# Altium PCB Thunderscope_Rev5.3.PcbDoc (part 3 of 14)
Units mil, origin at the board's own origin, x right, y up, seen from the top; angles counter-clockwise.
Board outline 3937.01 x 3838.58 mil, 6 copper layers (F.Cu, In1.Cu (GND), In2.Cu (Sign), In3.Cu (Sign), In4.Cu (GND), B.Cu), stack 60.556 mil thick; 911 components, 486 nets, 2834 pads, 2761 vias.
Unrouted connection lines stored in the file: 618.
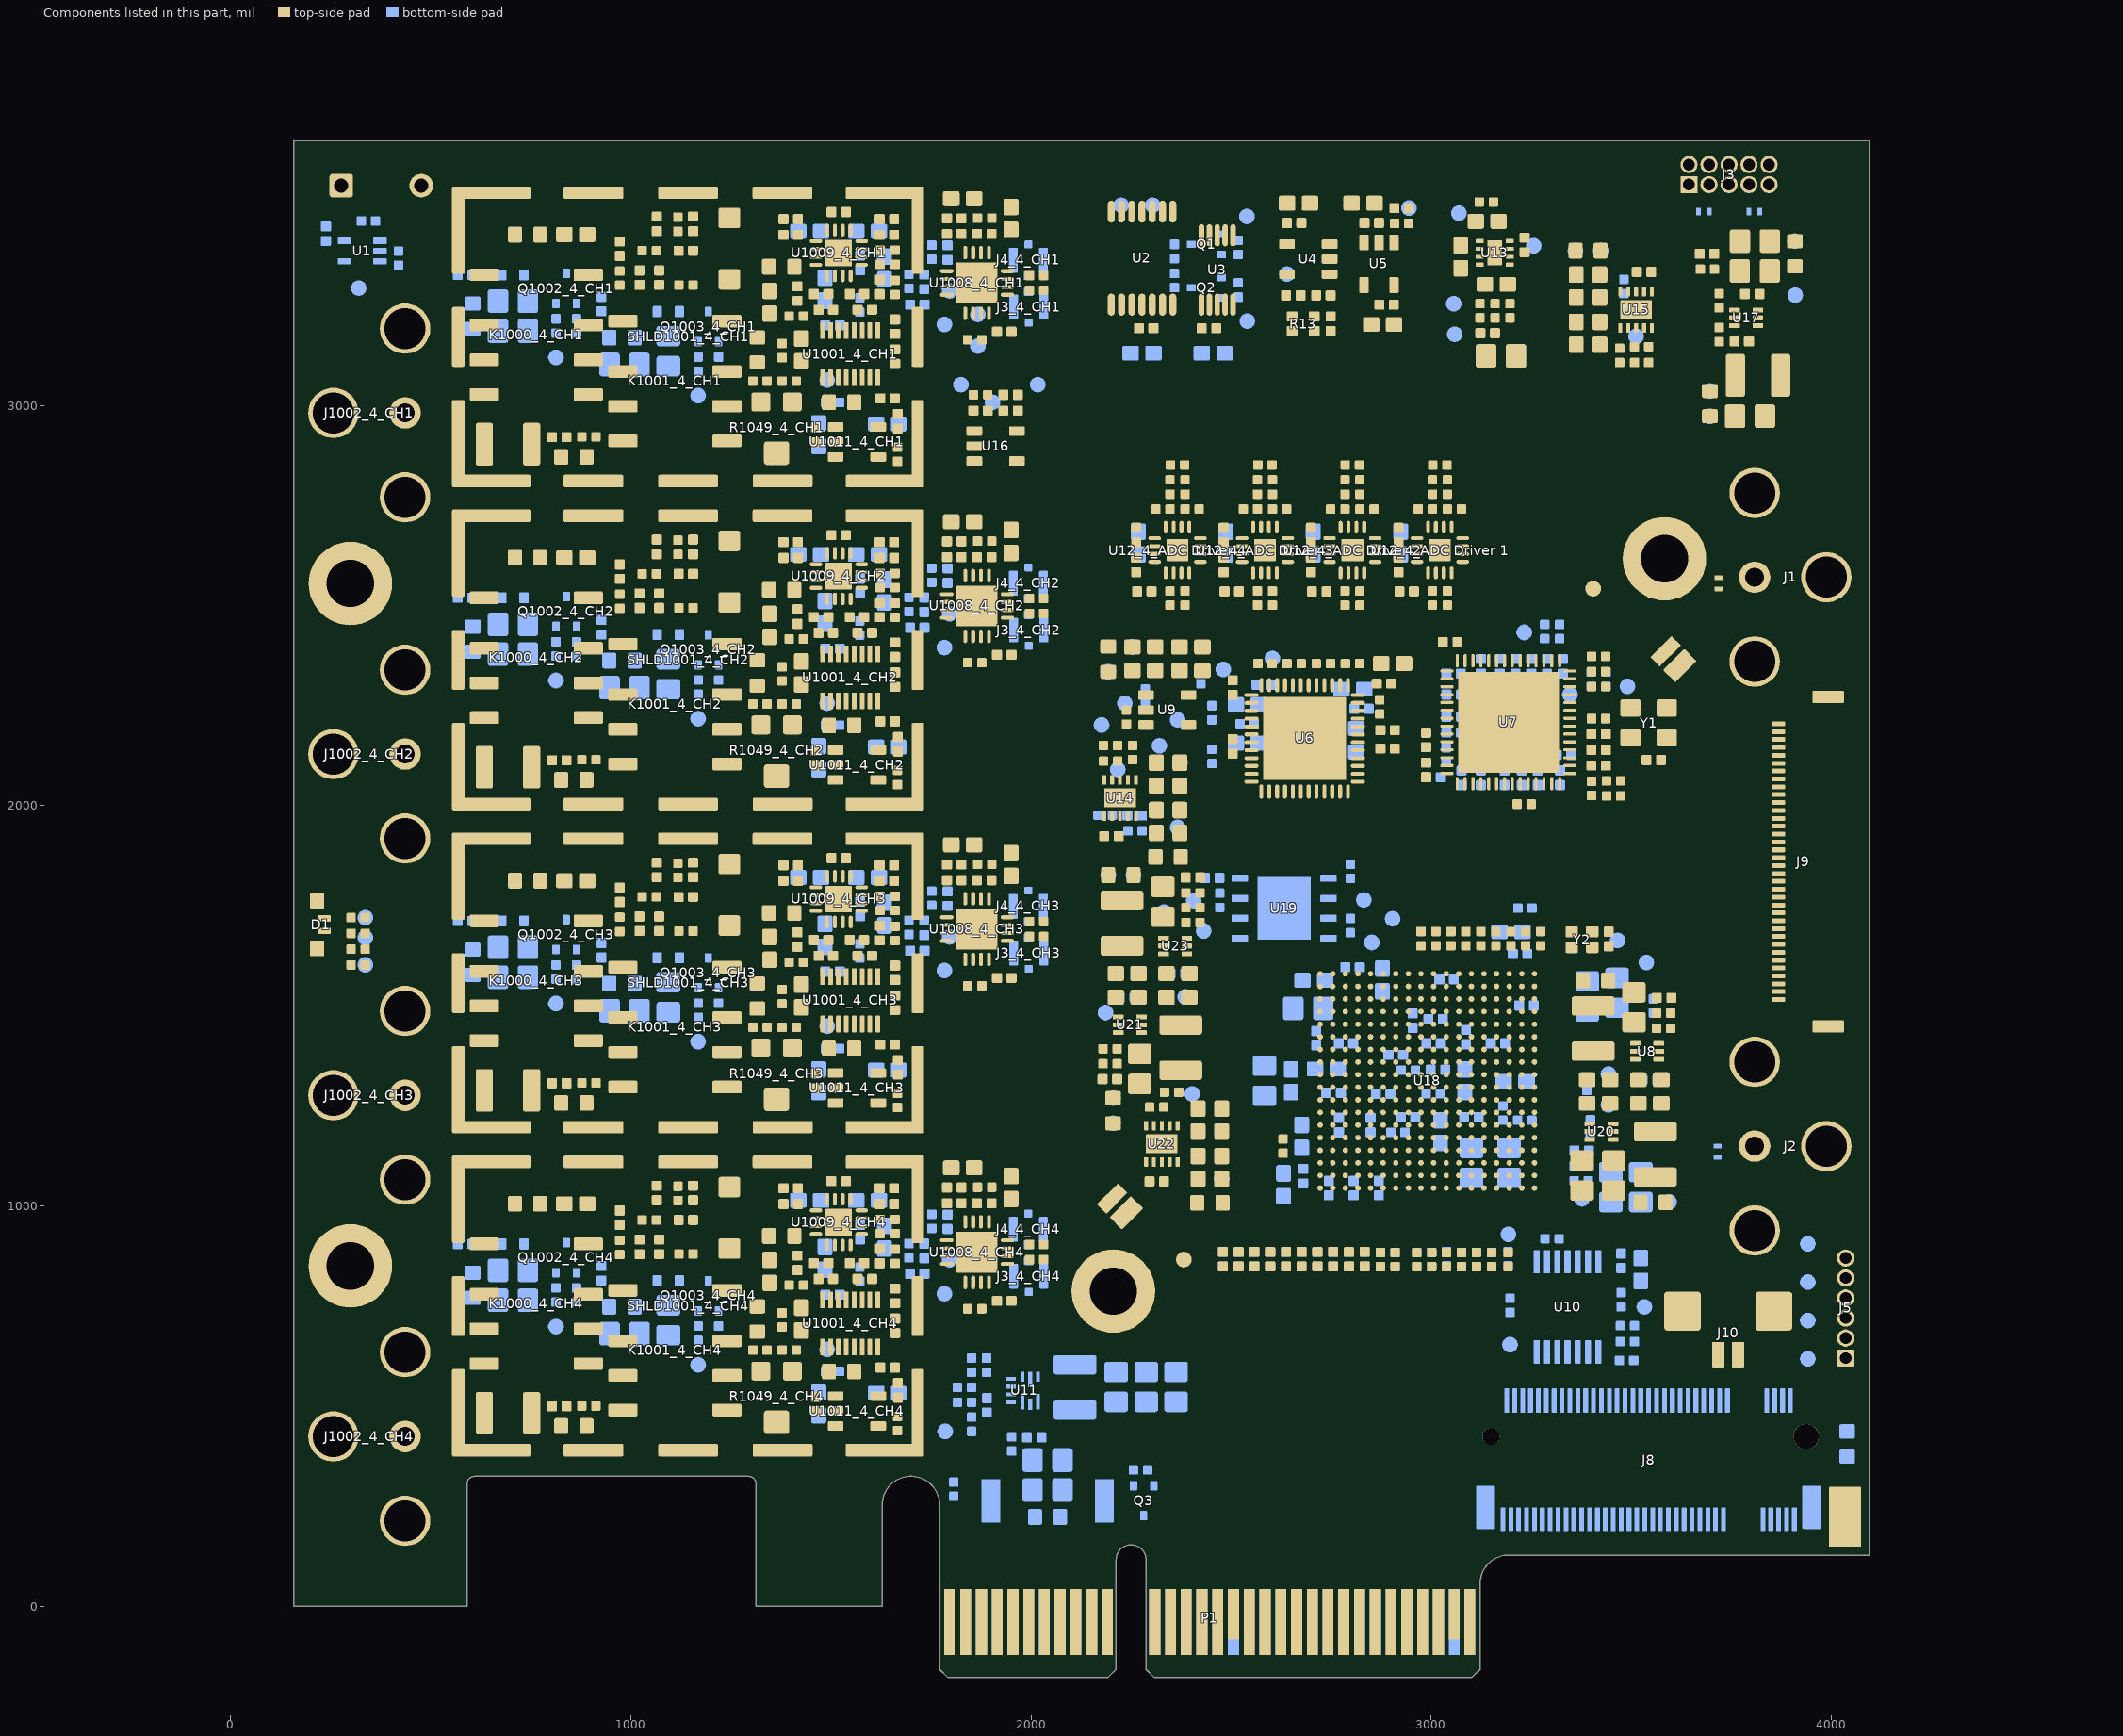
[diagram p7: the components of this part, seen from the top]

## Components (designator, comment, footprint, x,y, rotation, side; value= is the part's Value field where it differs from the comment) (continued)
R18 "DNP" GEN_R_0402 2584.65,2355.32 r180 top
R19 "DNP" GEN_R_0402 2657.21,2355.32 r180 top
R20 "DNP" GEN_R_0402 2730.31,2355.32 r180 top
R21 "DNP" GEN_R_0402 2803.15,2355.32 r180 top
R22 "100" GEN_R_0402 2871.35,2247.05 r270 top
R23 "49.9" GEN_R_0402 3191.93,866.14 r90 top
R24 "49.9" GEN_R_0402 3191.93,868.11 r90 bottom
R25 "0" GEN_R_0402 3150.59,866.14 r90 top
R26 "0" GEN_R_0402 3112.84,866.14 r90 top
R27 "0" GEN_R_0402 3150.59,866.14 r90 bottom
R28 "0" GEN_R_0402 3112.84,866.14 r90 bottom
R29 "0" GEN_R_0402 3075.44,866.14 r90 top
R30 "0" GEN_R_0402 3038.04,866.14 r90 top
R31 "0" GEN_R_0402 3075.44,866.14 r90 bottom
R32 "0" GEN_R_0402 3038.04,868.11 r90 bottom
R33 "0" GEN_R_0402 3000.98,866.14 r90 top
R34 "0" GEN_R_0402 2963.58,866.14 r90 top
R35 "0" GEN_R_0402 3000.98,866.14 r90 bottom
R36 "0" GEN_R_0402 2963.58,866.14 r90 bottom
R37 "0" GEN_R_0402 2910.08,866.14 r90 top
R38 "0" GEN_R_0402 2873.03,866.14 r90 top
R39 "0" GEN_R_0402 2909.78,866.14 r90 bottom
R40 "0" GEN_R_0402 2873.03,866.14 r90 bottom
R41 "0" GEN_R_0402 1807.09,292.32 r270 bottom
R42 "0.01" GEN_R_0603 2041.34,223.43 r0 bottom
R43 "49.9" GEN_R_0402 3232.28,2003.94 r180 top
R44 "1K" GEN_R_0402 3320.87,2435.04 r90 bottom
R45 "10K" GEN_R_0402 3283.46,2435.04 r270 bottom
R46 "4.7K" GEN_R_0402 3399.61,2315.94 r270 bottom
R47 "4.7K" GEN_R_0402 3437.01,2315.94 r270 bottom
R48 "1K" GEN_R_0402 3418.31,2297.24 r0 top
R49 "1K" GEN_R_0402 3418.31,2335.63 r0 top
R50 "1K" GEN_R_0402 3418.31,2217.52 r0 bottom
R51 "1K" GEN_R_0402 3418.31,2217.52 r0 top
R52 "1K" GEN_R_0402 3418.31,2373.03 r0 top
R52_4_CH1 "0" GEN_R_0402 2013.78,3324.8 r180 top (schematic designator R52_4)
R52_4_CH2 "0" GEN_R_0402 2013.78,2517.72 r180 top (schematic designator R52_4)
R52_4_CH3 "0" GEN_R_0402 2013.78,1710.63 r180 top (schematic designator R52_4)
R52_4_CH4 "0" GEN_R_0402 2013.78,903.54 r180 top (schematic designator R52_4)
R53 "1K" GEN_R_0402 3418.31,2179.13 r0 bottom
R54 "0.01" GEN_R_0603 4039.37,405.51 r270 bottom
R55 "90.9k" GEN_R_0402 3580.71,1481.74 r180 top
R56 "20k" GEN_R_0402 3580.71,1444.34 r180 top
R57 "0.01" GEN_R_0603 3410.43,1563.44 r0 top
R58 "10K" GEN_R_0402 3555.12,1500 r90 bottom
R59 "10K" GEN_R_0402 3234.25,1744.09 r180 bottom
R60 "100" GEN_R_0402 3302.16,918.31 r180 bottom
R61 "10K" GEN_R_0402 3196.85,751.97 r270 bottom
R62 "10K" GEN_R_0402 3474.41,765.75 r270 bottom
R63 "49.9" GEN_R_0402 3488.19,614.17 r180 bottom
R64 "2K" GEN_R_0402 318.9,1602.36 r0 top
R65 "1K" GEN_R_0402 318.9,1681.1 r180 top
R66 "10K" GEN_R_0402 2797.64,1700.39 r270 bottom
R67 "10K" GEN_R_0402 2797.64,1836.22 r270 bottom
R68 "10K" GEN_R_0402 2471.46,1763.78 r90 bottom
R69 "4.7K" GEN_R_0402 3375,1062.99 r0 bottom
R70 "4.7K" GEN_R_0402 2404.53,1745.08 r180 top
R71 "0.01" GEN_R_0603 3908.86,3378.94 r270 top
R72 "10K" GEN_R_0402 3719.49,3177.17 r90 top
R73 "4.7K" GEN_R_0402 1833.66,509.84 r180 bottom
R74 "1K" GEN_R_0402 1851.38,602.36 r270 bottom
R75 "10K" GEN_R_0402 3273.62,1668.31 r90 top
R76 "10K" GEN_R_0402 3236.22,1668.31 r90 top
R77 "10K" GEN_R_0402 3161.42,1668.31 r90 top
R78 "10K" GEN_R_0402 3198.82,1668.31 r90 top
R79 "10K" GEN_R_0402 3124.02,1668.31 r90 top
R80 "10K" GEN_R_0402 3086.61,1668.31 r90 top
R81 "10K" GEN_R_0402 3049.21,1668.31 r90 top
R82 "10K" GEN_R_0402 3011.81,1668.31 r90 top
R85 "1K" GEN_R_0402 318.9,1641.73 r180 top
R86 "10K" GEN_R_0402 2259.84,1937.01 r180 bottom
R87 "10K" GEN_R_0402 1951.77,405.51 r90 bottom
R88 "35.7k" GEN_R_0402 1888.78,602.36 r270 bottom
R89 "0.01" GEN_R_0603 2192.91,2366.14 r270 top
R90 "0.1" GEN_R_0402 3137.8,3508.27 r0 top
R91 "120@100MHZ" GEN_R_0402 3122.05,3236.61 r90 top
R92 "10K" GEN_R_0402 1851.38,454.72 r90 bottom
R93 "280K" GEN_R_0402 3159.45,3236.61 r270 top
R94 "10K" GEN_R_0402 2238.19,2221.46 r270 top
R95 "1K" GEN_R_0402 1833.66,547.24 r180 bottom
R96 "90.9k" GEN_R_0402 3196.85,3236.61 r90 top
R97 "0.01" GEN_R_0603 2342.52,1872.05 r180 top
R97_4_CH1 "0" GEN_R_0402 2013.78,3287.4 r180 top (schematic designator R97_4)
R97_4_CH2 "0" GEN_R_0402 2013.78,2480.32 r180 top (schematic designator R97_4)
R97_4_CH3 "0" GEN_R_0402 2013.78,1673.23 r180 top (schematic designator R97_4)
R97_4_CH4 "0" GEN_R_0402 2013.78,866.14 r180 top (schematic designator R97_4)
R98 "0.01" GEN_R_0603 3391.93,3386.81 r0 top
R99 "4.7K" GEN_R_0402 2253.94,2132.87 r90 top
R100 "20k" GEN_R_0402 3470.67,3125 r270 top
R101 "10K" GEN_R_0402 2185.04,1976.38 r180 bottom
R102 "4.7K" GEN_R_0402 2198.82,2111.22 r180 top
R103 "20k" GEN_R_0402 2198.82,2150.59 r180 top
R104 "4.7K" GEN_R_0402 3525.79,3146.65 r0 top
R105 "20k" GEN_R_0402 3525.79,3107.28 r0 top
R106 "0.1" GEN_R_0402 1874.02,3026.57 r0 top
R107 "100" GEN_R_0402 2926.08,3454.92 r0 top
R108 "10K" GEN_R_0402 2273.62,340.55 r180 bottom
R109 "280K" GEN_R_0402 3689.76,3340.35 r180 top
R110 "35.7k" GEN_R_0402 3719.49,3261.81 r270 top
R111 "10K" GEN_R_0402 3481.3,3297.24 r90 bottom
R112 "100" GEN_R_0402 2974.41,1668.31 r270 top
R113 "4.7K" GEN_R_0402 3233.91,1214.04 r0 bottom
R114 "4.7K" GEN_R_0402 3178.8,1232.54 r90 bottom
R115 "100" GEN_R_0402 2629.92,1149.61 r270 top
R116 "0.01" GEN_R_0603 3554.13,1008.86 r180 top
R117 "10K" GEN_R_0402 3388.78,1270.67 r270 bottom
R118 "10K" GEN_R_0402 3375,1100.39 r0 bottom
R119 "4.7K" GEN_R_0402 3397.64,1197.83 r270 bottom
R120 "0.01" GEN_R_0603 2204.72,1238.19 r90 top
R121 "10K" GEN_R_0402 2240.16,1521.65 r180 bottom
R122 "20k" GEN_R_0402 2197.83,1355.31 r180 top
R123 "0.01" GEN_R_0603 2446.85,1007.87 r180 top
R124 "10K" GEN_R_0402 2197.83,1392.72 r0 top
R125 "1K" GEN_R_0402 2351.38,1284.45 r0 top
R126 "0.01" GEN_R_0603 2224.41,1826.77 r0 top
R127 "2K" GEN_R_0402 2314.17,1247.05 r0 top
R128 "10K" GEN_R_0402 2367.13,1580.71 r0 bottom
R129 "10K" GEN_R_0402 2404.53,1782.48 r0 top
R130 "10K" GEN_R_0402 2404.53,1707.68 r0 top
"R131_4_ADC Driver 1" "120" GEN_R_0402 3021.53,2851.38 r180 top (schematic designator R131_4)
"R131_4_ADC Driver 2" "120" GEN_R_0402 2803.02,2851.38 r180 top (schematic designator R131_4)
"R131_4_ADC Driver 3" "120" GEN_R_0402 2584.51,2851.38 r180 top (schematic designator R131_4)
"R131_4_ADC Driver 4" "120" GEN_R_0402 2366.01,2851.38 r180 top (schematic designator R131_4)
"R132_4_ADC Driver 1" "300" GEN_R_0402 3040.23,2796.26 r90 top (schematic designator R132_4)
"R132_4_ADC Driver 2" "300" GEN_R_0402 2821.72,2796.26 r90 top (schematic designator R132_4)
"R132_4_ADC Driver 3" "300" GEN_R_0402 2603.21,2796.26 r90 top (schematic designator R132_4)
"R132_4_ADC Driver 4" "300" GEN_R_0402 2384.71,2796.26 r90 top (schematic designator R132_4)
"R133_4_ADC Driver 1" "300" GEN_R_0402 3002.83,2796.26 r90 top (schematic designator R133_4)
"R133_4_ADC Driver 2" "300" GEN_R_0402 2784.32,2796.26 r90 top (schematic designator R133_4)
"R133_4_ADC Driver 3" "300" GEN_R_0402 2565.81,2796.26 r90 top (schematic designator R133_4)
"R133_4_ADC Driver 4" "300" GEN_R_0402 2347.31,2796.26 r90 top (schematic designator R133_4)
"R134_4_ADC Driver 1" "300" GEN_R_0402 3057.94,2741.14 r180 top (schematic designator R134_4)
"R134_4_ADC Driver 2" "300" GEN_R_0402 2839.44,2741.14 r180 top (schematic designator R134_4)
"R134_4_ADC Driver 3" "300" GEN_R_0402 2620.93,2741.14 r180 top (schematic designator R134_4)
"R134_4_ADC Driver 4" "300" GEN_R_0402 2402.42,2741.14 r180 top (schematic designator R134_4)
"R135_4_ADC Driver 1" "300" GEN_R_0402 2985.11,2741.14 r0 top (schematic designator R135_4)
"R135_4_ADC Driver 2" "300" GEN_R_0402 2766.6,2741.14 r0 top (schematic designator R135_4)
"R135_4_ADC Driver 3" "300" GEN_R_0402 2548.1,2741.14 r0 top (schematic designator R135_4)
"R135_4_ADC Driver 4" "300" GEN_R_0402 2329.59,2741.14 r0 top (schematic designator R135_4)
"R136_4_ADC Driver 1" "4.99" GEN_R_0402 3040.23,2518.7 r90 top (schematic designator R136_4)
"R136_4_ADC Driver 2" "4.99" GEN_R_0402 2821.72,2518.7 r90 top (schematic designator R136_4)
"R136_4_ADC Driver 3" "4.99" GEN_R_0402 2603.21,2518.7 r90 top (schematic designator R136_4)
"R136_4_ADC Driver 4" "4.99" GEN_R_0402 2384.71,2518.7 r90 top (schematic designator R136_4)
"R137_4_ADC Driver 1" "4.99" GEN_R_0402 3002.83,2518.7 r90 top (schematic designator R137_4)
"R137_4_ADC Driver 2" "4.99" GEN_R_0402 2784.32,2518.7 r90 top (schematic designator R137_4)
"R137_4_ADC Driver 3" "4.99" GEN_R_0402 2565.81,2518.7 r90 top (schematic designator R137_4)
"R137_4_ADC Driver 4" "4.99" GEN_R_0402 2347.31,2518.7 r90 top (schematic designator R137_4)
R1001_4_CH1 "1K" GEN_R_0402 972.44,3317.91 r90 top (schematic designator R1001_4)
R1001_4_CH2 "1K" GEN_R_0402 972.44,2510.83 r90 top (schematic designator R1001_4)
R1001_4_CH3 "1K" GEN_R_0402 972.44,1703.74 r90 top (schematic designator R1001_4)
R1001_4_CH4 "1K" GEN_R_0402 972.44,896.65 r90 top (schematic designator R1001_4)
R1002_4_CH1 "976k" GEN_R_0402 1046.26,3386.42 r180 top (schematic designator R1002_4)
R1002_4_CH2 "976k" GEN_R_0402 1046.26,2579.33 r180 top (schematic designator R1002_4)
R1002_4_CH3 "976k" GEN_R_0402 1046.26,1772.24 r180 top (schematic designator R1002_4)
R1002_4_CH4 "976k" GEN_R_0402 1046.26,965.16 r180 top (schematic designator R1002_4)
R1003_4_CH1 "10M" GEN_R_0603 1526.57,3007.87 r0 top (schematic designator R1003_4)
R1003_4_CH2 "10M" GEN_R_0603 1526.57,2200.79 r0 top (schematic designator R1003_4)
R1003_4_CH3 "10M" GEN_R_0603 1526.57,1393.7 r0 top (schematic designator R1003_4)
R1003_4_CH4 "10M" GEN_R_0603 1526.57,586.61 r0 top (schematic designator R1003_4)
R1021_4_CH1 "15" GEN_R_0603 857.58,2871.56 r0 top (schematic designator R1021_4)
R1021_4_CH2 "15" GEN_R_0603 857.58,2064.47 r0 top (schematic designator R1021_4)
R1021_4_CH3 "15" GEN_R_0603 857.58,1257.38 r0 top (schematic designator R1021_4)
R1021_4_CH4 "15" GEN_R_0603 857.58,450.3 r0 top (schematic designator R1021_4)
R1022_4_CH1 "30" GEN_R_0603 742.13,3426.89 r0 top (schematic designator R1022_4)
R1022_4_CH2 "30" GEN_R_0603 742.13,2619.8 r0 top (schematic designator R1022_4)
R1022_4_CH3 "30" GEN_R_0603 742.13,1812.72 r0 top (schematic designator R1022_4)
R1022_4_CH4 "30" GEN_R_0603 742.13,1005.65 r0 top (schematic designator R1022_4)
R1024_4_CH1 "976k" GEN_R_0402 1137.8,3301.18 r180 top (schematic designator R1024_4)
R1024_4_CH2 "976k" GEN_R_0402 1137.8,2494.09 r180 top (schematic designator R1024_4)
R1024_4_CH3 "976k" GEN_R_0402 1137.8,1687.01 r180 top (schematic designator R1024_4)
R1024_4_CH4 "976k" GEN_R_0402 1137.8,879.92 r180 top (schematic designator R1024_4)
R1025_4_CH1 "49.9" GEN_R_1206 693,2903.27 r0 top (schematic designator R1025_4)
R1025_4_CH2 "49.9" GEN_R_1206 693,2096.18 r0 top (schematic designator R1025_4)
R1025_4_CH3 "49.9" GEN_R_1206 693,1289.09 r0 top (schematic designator R1025_4)
R1025_4_CH4 "49.9" GEN_R_1206 693,482 r0 top (schematic designator R1025_4)
R1026_4_CH1 "20k" GEN_R_0402 1117.32,3452.76 r90 top (schematic designator R1026_4)
R1026_4_CH2 "20k" GEN_R_0402 1117.32,2645.67 r90 top (schematic designator R1026_4)
R1026_4_CH3 "20k" GEN_R_0402 1117.32,1838.58 r90 top (schematic designator R1026_4)
R1026_4_CH4 "20k" GEN_R_0402 1117.32,1031.5 r90 top (schematic designator R1026_4)
R1027_4_CH1 "22" GEN_R_0603 605.12,3223.23 r270 bottom (schematic designator R1027_4)
R1027_4_CH2 "22" GEN_R_0603 605.12,2416.14 r270 bottom (schematic designator R1027_4)
R1027_4_CH3 "22" GEN_R_0603 605.12,1609.06 r270 bottom (schematic designator R1027_4)
R1027_4_CH4 "22" GEN_R_0603 605.12,801.97 r270 bottom (schematic designator R1027_4)
R1028_4_CH1 "22" GEN_R_0603 977.95,3169.69 r0 bottom (schematic designator R1028_4)
R1028_4_CH2 "22" GEN_R_0603 977.95,2362.6 r0 bottom (schematic designator R1028_4)
R1028_4_CH3 "22" GEN_R_0603 977.95,1555.51 r0 bottom (schematic designator R1028_4)
R1028_4_CH4 "22" GEN_R_0603 977.95,748.43 r0 bottom (schematic designator R1028_4)
R1029_4_CH1 "10K" GEN_R_0402 864.17,3198.82 r90 bottom (schematic designator R1029_4)
R1029_4_CH2 "10K" GEN_R_0402 864.17,2391.73 r90 bottom (schematic designator R1029_4)
R1029_4_CH3 "10K" GEN_R_0402 864.17,1584.65 r90 bottom (schematic designator R1029_4)
R1029_4_CH4 "10K" GEN_R_0402 864.17,777.56 r90 bottom (schematic designator R1029_4)
R1030_4_CH1 "10K" GEN_R_0402 1219.49,3103.35 r90 bottom (schematic designator R1030_4)
R1030_4_CH2 "10K" GEN_R_0402 1219.49,2296.26 r90 bottom (schematic designator R1030_4)
R1030_4_CH3 "10K" GEN_R_0402 1219.49,1489.17 r90 bottom (schematic designator R1030_4)
R1030_4_CH4 "10K" GEN_R_0402 1219.49,682.09 r90 bottom (schematic designator R1030_4)
R1031_4_CH1 "10K" GEN_R_0402 812.99,3198.82 r270 bottom (schematic designator R1031_4)
R1031_4_CH2 "10K" GEN_R_0402 812.99,2391.73 r270 bottom (schematic designator R1031_4)
R1031_4_CH3 "10K" GEN_R_0402 812.99,1584.65 r270 bottom (schematic designator R1031_4)
R1031_4_CH4 "10K" GEN_R_0402 812.99,777.56 r270 bottom (schematic designator R1031_4)
R1032_4_CH1 "10K" GEN_R_0402 1168.31,3103.35 r270 bottom (schematic designator R1032_4)
R1032_4_CH2 "10K" GEN_R_0402 1168.31,2296.26 r270 bottom (schematic designator R1032_4)
R1032_4_CH3 "10K" GEN_R_0402 1168.31,1489.17 r270 bottom (schematic designator R1032_4)
R1032_4_CH4 "10K" GEN_R_0402 1168.31,682.09 r270 bottom (schematic designator R1032_4)
R1033_4_CH1 "10K" GEN_R_0402 1859.25,3164.37 r0 top (schematic designator R1033_4)
R1033_4_CH2 "10K" GEN_R_0402 1859.25,2357.28 r0 top (schematic designator R1033_4)
R1033_4_CH3 "10K" GEN_R_0402 1859.25,1550.2 r0 top (schematic designator R1033_4)
R1033_4_CH4 "10K" GEN_R_0402 1859.25,743.11 r0 top (schematic designator R1033_4)
R1035_4_CH1 "30" GEN_R_0603 1315.94,3138.78 r270 top (schematic designator R1035_4)
R1035_4_CH2 "30" GEN_R_0603 1315.94,2331.69 r270 top (schematic designator R1035_4)
R1035_4_CH3 "30" GEN_R_0603 1315.94,1524.61 r270 top (schematic designator R1035_4)
R1035_4_CH4 "30" GEN_R_0603 1315.94,717.52 r270 top (schematic designator R1035_4)
R1036_4_CH1 "35.7k" GEN_R_0402 1571.85,3250.98 r90 bottom (schematic designator R1036_4)
R1036_4_CH2 "35.7k" GEN_R_0402 1571.85,2443.9 r90 bottom (schematic designator R1036_4)
R1036_4_CH3 "35.7k" GEN_R_0402 1571.85,1636.81 r90 bottom (schematic designator R1036_4)
R1036_4_CH4 "35.7k" GEN_R_0402 1571.85,829.72 r90 bottom (schematic designator R1036_4)
R1037_4_CH1 "49.9" GEN_R_0402 1660.43,3370.08 r90 top (schematic designator R1037_4)
R1037_4_CH2 "49.9" GEN_R_0402 1660.43,2562.99 r90 top (schematic designator R1037_4)
R1037_4_CH3 "49.9" GEN_R_0402 1660.43,1755.91 r90 top (schematic designator R1037_4)
R1037_4_CH4 "49.9" GEN_R_0402 1660.43,948.82 r90 top (schematic designator R1037_4)
R1038_4_CH1 "10M" GEN_R_0603 1376.97,3346.46 r0 top (schematic designator R1038_4)
R1038_4_CH2 "10M" GEN_R_0603 1376.97,2539.37 r0 top (schematic designator R1038_4)
R1038_4_CH3 "10M" GEN_R_0603 1376.97,1732.28 r0 top (schematic designator R1038_4)
R1038_4_CH4 "10M" GEN_R_0603 1376.97,925.2 r0 top (schematic designator R1038_4)
R1039_4_CH1 "909k" GEN_R_0402 1322.83,3061.02 r180 top (schematic designator R1039_4)
R1039_4_CH2 "909k" GEN_R_0402 1322.83,2253.94 r180 top (schematic designator R1039_4)
R1039_4_CH3 "909k" GEN_R_0402 1322.83,1446.85 r180 top (schematic designator R1039_4)
R1039_4_CH4 "909k" GEN_R_0402 1322.83,639.76 r180 top (schematic designator R1039_4)
R1041_4_CH1 "90.9k" GEN_R_0402 1623.03,3370.08 r90 top (schematic designator R1041_4)
R1041_4_CH2 "90.9k" GEN_R_0402 1623.03,2562.99 r90 top (schematic designator R1041_4)
R1041_4_CH3 "90.9k" GEN_R_0402 1623.03,1755.91 r90 top (schematic designator R1041_4)
R1041_4_CH4 "90.9k" GEN_R_0402 1623.03,948.82 r90 top (schematic designator R1041_4)
R1042_4_CH1 "90.9k" GEN_R_0402 1660.43,3295.28 r270 top (schematic designator R1042_4)
R1042_4_CH2 "90.9k" GEN_R_0402 1660.43,2488.19 r270 top (schematic designator R1042_4)
R1042_4_CH3 "90.9k" GEN_R_0402 1660.43,1681.1 r270 top (schematic designator R1042_4)
R1042_4_CH4 "90.9k" GEN_R_0402 1660.43,874.02 r270 top (schematic designator R1042_4)
R1043_4_CH1 "2K" GEN_R_0402 1413.39,3223.43 r180 top (schematic designator R1043_4)
R1043_4_CH2 "2K" GEN_R_0402 1413.39,2416.34 r180 top (schematic designator R1043_4)
R1043_4_CH3 "2K" GEN_R_0402 1413.39,1609.25 r180 top (schematic designator R1043_4)
R1043_4_CH4 "2K" GEN_R_0402 1413.39,802.17 r180 top (schematic designator R1043_4)
R1044_4_CH1 "10K" GEN_R_0402 1666.34,2877.95 r90 top (schematic designator R1044_4)
R1044_4_CH2 "10K" GEN_R_0402 1666.34,2070.87 r90 top (schematic designator R1044_4)
R1044_4_CH3 "10K" GEN_R_0402 1666.34,1263.78 r90 top (schematic designator R1044_4)
R1044_4_CH4 "10K" GEN_R_0402 1666.34,456.69 r90 top (schematic designator R1044_4)
R1045_4_CH1 "1K" GEN_R_0402 1714.57,3382.87 r90 bottom (schematic designator R1045_4)
R1045_4_CH2 "1K" GEN_R_0402 1714.57,2575.79 r90 bottom (schematic designator R1045_4)
R1045_4_CH3 "1K" GEN_R_0402 1714.57,1768.7 r90 bottom (schematic designator R1045_4)
R1045_4_CH4 "1K" GEN_R_0402 1714.57,961.61 r90 bottom (schematic designator R1045_4)
R1046_4_CH1 "1K" GEN_R_0402 1751.97,3382.87 r90 bottom (schematic designator R1046_4)
R1046_4_CH2 "1K" GEN_R_0402 1751.97,2575.79 r90 bottom (schematic designator R1046_4)
R1046_4_CH3 "1K" GEN_R_0402 1751.97,1768.7 r90 bottom (schematic designator R1046_4)
R1046_4_CH4 "1K" GEN_R_0402 1751.97,961.61 r90 bottom (schematic designator R1046_4)
R1047_4_CH1 "90.9k" GEN_R_0402 1377.95,3136.81 r270 top (schematic designator R1047_4)
R1047_4_CH2 "90.9k" GEN_R_0402 1377.95,2329.72 r270 top (schematic designator R1047_4)
R1047_4_CH3 "90.9k" GEN_R_0402 1377.95,1522.64 r270 top (schematic designator R1047_4)
R1047_4_CH4 "90.9k" GEN_R_0402 1377.95,715.55 r270 top (schematic designator R1047_4)
R1048_4_CH1 "DNP" GEN_R_0402 1395.67,3061.02 r180 top (schematic designator R1048_4)
R1048_4_CH2 "DNP" GEN_R_0402 1395.67,2253.94 r180 top (schematic designator R1048_4)
R1048_4_CH3 "DNP" GEN_R_0402 1395.67,1446.85 r180 top (schematic designator R1048_4)
R1048_4_CH4 "DNP" GEN_R_0402 1395.67,639.76 r180 top (schematic designator R1048_4)
R1049_4_CH1 "2K TRIMPOT" BOU_3MM_POT 1364.17,2947.83 r180 top (schematic designator R1049_4)
R1049_4_CH2 "2K TRIMPOT" BOU_3MM_POT 1364.17,2140.75 r180 top (schematic designator R1049_4)
R1049_4_CH3 "2K TRIMPOT" BOU_3MM_POT 1364.17,1333.66 r180 top (schematic designator R1049_4)
R1049_4_CH4 "2K TRIMPOT" BOU_3MM_POT 1364.17,526.57 r180 top (schematic designator R1049_4)
R1052_4_CH1 "10K" GEN_R_0402 1503.94,3007.87 r0 bottom (schematic designator R1052_4)
R1052_4_CH2 "10K" GEN_R_0402 1503.94,2200.79 r0 bottom (schematic designator R1052_4)
R1052_4_CH3 "10K" GEN_R_0402 1503.94,1393.7 r0 bottom (schematic designator R1052_4)
R1052_4_CH4 "10K" GEN_R_0402 1503.94,586.61 r0 bottom (schematic designator R1052_4)
R1053_4_CH1 "0" GEN_R_0402 894.98,2921.75 r180 top (schematic designator R1053_4)
R1053_4_CH2 "0" GEN_R_0402 894.98,2114.67 r180 top (schematic designator R1053_4)
R1053_4_CH3 "0" GEN_R_0402 894.98,1307.58 r180 top (schematic designator R1053_4)
R1053_4_CH4 "0" GEN_R_0402 894.98,500.49 r180 top (schematic designator R1053_4)
REF** "Comment" Paw 196.85,314.96 r90 bottom value=Paw
REF** "Comment" Paw 196.85,118.11 r90 bottom value=Paw
REF** "Comment" Heart 196.76,225.66 r90 bottom value=Heart
REF** "Comment" OSHW-Logo_5.7x6mm_SilkScreen 2997.05,2912.4 r0 bottom value=OSHW-Logo_5.7x6mm_SilkScreen
REF** "Comment" UKCA-Logo_3.3x3.3mm_SilkScreen 192.91,3429.13 r0 top value=UKCA-Logo_3.3x3.3mm_SilkScreen
REF** "Comment" CE-Logo_3.3x4.5mm_SilkScreen 350.39,3429.13 r0 top value=CE-Logo_3.3x4.5mm_SilkScreen
SHLD1001_4_CH1 "2118728-2" TE_2118728-2 1142.96,3171.36 r180 top (schematic designator SHLD1001_4)
SHLD1001_4_CH2 "2118728-2" TE_2118728-2 1142.96,2364.28 r180 top (schematic designator SHLD1001_4)
SHLD1001_4_CH3 "2118728-2" TE_2118728-2 1142.96,1557.19 r180 top (schematic designator SHLD1001_4)
SHLD1001_4_CH4 "2118728-2" TE_2118728-2 1142.96,750.1 r180 top (schematic designator SHLD1001_4)
SO1 "2.5mm M2 SMT Standoff" STANDOFF_M2_9774025243R 3582.68,2617.13 r180 top
SO2 "2.5mm M2 SMT Standoff" STANDOFF_M2_9774025243R 2205.71,787.4 r180 top
SO3 "2.5mm M2 SMT Standoff" STANDOFF_M2_9774025243R 299.21,850.39 r0 top
SO4 "2.5mm M2 SMT Standoff" STANDOFF_M2_9774025243R 299.21,2555.12 r0 top
SYM1 "SYM_ESD_Large" ESD-Logo_6.6x6mm_SilkScreen 2007.87,249.02 r0 top
TP1 "PCB" GEN_TP_PCB 2176.18,2201.77 r180 bottom
TP2 "5019" KEY_5019 4033.94,223.73 r90 top
TP4 "PCB" GEN_TP_PCB 3255.91,3399.02 r0 bottom
TP5 "PCB" GEN_TP_PCB 2603.35,2368.11 r90 bottom
TP6 "PCB" GEN_TP_PCB 2304.13,3500 r270 bottom
TP7 "PCB" GEN_TP_PCB 2225.39,3500 r90 bottom
TP8 "PCB" GEN_TP_PCB 2639.76,3328.15 r270 bottom
TP9 "PCB" GEN_TP_PCB 2944.19,3493.11 r180 bottom
TP10 "PCB" GEN_TP_PCB 2234.25,2255.91 r0 bottom
TP11 "PCB" GEN_TP_PCB 2366.14,2214.57 r270 bottom
TP12 "PCB" GEN_TP_PCB 2320.87,2149.61 r270 bottom
TP13 "PCB" GEN_TP_PCB 3192.91,929.13 r90 bottom
TP14 "5015" KEY_5015 2183.07,263.78 r270 bottom
TP15 "5015" KEY_5015 1899.61,263.78 r90 bottom
TP16 "PCB" GEN_TP_PCB 3490.16,2298.23 r270 bottom
TP17 "PCB" GEN_TP_PCB 3346.46,2277.56 r90 bottom
TP18 "PCB" GEN_TP_PCB 3232.28,2433.07 r0 bottom
TP21 "PCB" GEN_TP_PCB 3696.26,3036.02 r180 bottom
TP22 "PCB" GEN_TP_PCB 3696.26,2973.03 r180 bottom
TP23 "PCB" GEN_TP_PCB 3511.81,3172.44 r180 bottom
TP24 "PCB" GEN_TP_PCB 2216.54,2090.55 r180 bottom
TP25 "PCB" GEN_TP_PCB 1867.13,3148.62 r180 bottom
TP26 "PCB" GEN_TP_PCB 2252.95,2396.65 r180 bottom
TP27 "PCB" GEN_TP_PCB 2480.56,2340.47 r180 bottom
TP28 "PCB" GEN_TP_PCB 3069.02,3480.43 r0 bottom
TP29 "PCB" GEN_TP_PCB 3056.3,3254.33 r0 bottom
TP30 "PCB" GEN_TP_PCB 2192.91,2334.65 r180 bottom
TP31 "PCB" GEN_TP_PCB 3058.66,3177.95 r0 bottom
TP32 "PCB" GEN_TP_PCB 2366.14,1945.87 r180 bottom
TP33 "PCB" GEN_TP_PCB 2372.05,2107.28 r180 bottom
TP34 "PCB" GEN_TP_PCB 3360.43,3386.81 r270 bottom
TP35 "PCB" GEN_TP_PCB 3421.46,3151.57 r180 bottom
TP37 "PCB" GEN_TP_PCB 3423.42,3386.81 r180 bottom
TP38 "PCB" GEN_TP_PCB 1824.8,3052.17 r0 bottom
TP39 "PCB" GEN_TP_PCB 2016.73,3052.17 r0 bottom
TP40 "PCB" GEN_TP_PCB 1903.54,3007.8 r0 bottom
TP42 "PCB" GEN_TP_PCB 1867.13,3227.36 r180 bottom
TP43 "PCB" GEN_TP_PCB 2431.5,1687.4 r90 bottom
TP44 "PCB" GEN_TP_PCB 3442.91,1329.72 r180 bottom
TP46 "PCB" GEN_TP_PCB 2831.58,1764.76 r180 bottom
TP47 "PCB" GEN_TP_PCB 2332.28,1734.65 r180 bottom
TP48 "PCB" GEN_TP_PCB 2851.38,1658.46 r180 bottom
TP49 "PCB" GEN_TP_PCB 2476.38,1067.91 r180 bottom
TP50 "PCB" GEN_TP_PCB 2402.75,1280.12 r180 bottom
TP52 "PCB" GEN_TP_PCB 2406.5,1762.8 r180 bottom
TP53 "PCB" GEN_TP_PCB 2903.54,1717.52 r180 bottom
TP54 "PCB" GEN_TP_PCB 3532.48,748.03 r180 bottom
TP55 "PCB" GEN_TP_PCB 3196.85,653.54 r180 bottom
TP56 "PCB" GEN_TP_PCB 336.61,1602.36 r180 bottom
TP57 "PCB" GEN_TP_PCB 336.61,1720.47 r180 bottom
TP58 "PCB" GEN_TP_PCB 336.61,1670.48 r180 bottom
TP59 "PCB" GEN_TP_PCB 2539.37,3472.44 r180 bottom
TP60 "PCB" GEN_TP_PCB 2540.35,3210.63 r180 bottom
TP61 "PCB" GEN_TP_PCB 319.88,3293.31 r180 bottom
TP63 "PCB" GEN_TP_PCB 2204.72,1269.69 r180 bottom
TP64 "PCB" GEN_TP_PCB 2204.72,1206.69 r180 bottom
TP65 "PCB" GEN_TP_PCB 3376.28,1018.03 r180 bottom
TP66 "PCB" GEN_TP_PCB 3594.43,1009.84 r180 bottom
TP67 "PCB" GEN_TP_PCB 2255.91,1826.77 r180 bottom
TP68 "PCB" GEN_TP_PCB 2192.91,1826.77 r180 bottom
TP69 "PCB" GEN_TP_PCB 3537.4,1608.27 r180 bottom
TP70 "PCB" GEN_TP_PCB 3465.55,1663.39 r180 bottom
TP71 "PCB" GEN_TP_PCB 3909.45,3275.59 r180 bottom
TP72 "PCB" GEN_TP_PCB 3908.86,3410.43 r180 bottom
TP75 "PCB" GEN_TP_PCB 3940.94,713.91 r180 bottom
TP76 "PCB" GEN_TP_PCB 3940.94,809.71 r180 bottom
TP77 "PCB" GEN_TP_PCB 3940.94,905.51 r180 bottom
TP78 "PCB" GEN_TP_PCB 3940.94,618.11 r180 bottom
TP79 "PCB" GEN_TP_PCB 2186.22,1483.07 r180 bottom
TP80 "PCB" GEN_TP_PCB 2384.84,1522.64 r180 bottom
TP81 "PCB" GEN_TP_PCB 3442.91,1252.95 r180 bottom
TP86 "PCB" GEN_TP_PCB 1785.43,437.01 r90 bottom
TP1014_4_CH1 "PCB" GEN_TP_PCB 812.99,3120.08 r270 bottom (schematic designator TP1014_4)
TP1014_4_CH2 "PCB" GEN_TP_PCB 812.99,2312.99 r270 bottom (schematic designator TP1014_4)
TP1014_4_CH3 "PCB" GEN_TP_PCB 812.99,1505.91 r270 bottom (schematic designator TP1014_4)
TP1014_4_CH4 "PCB" GEN_TP_PCB 812.99,698.82 r270 bottom (schematic designator TP1014_4)
TP1015_4_CH1 "PCB" GEN_TP_PCB 1168.31,3024.61 r270 bottom (schematic designator TP1015_4)
TP1015_4_CH2 "PCB" GEN_TP_PCB 1168.31,2217.52 r270 bottom (schematic designator TP1015_4)
TP1015_4_CH3 "PCB" GEN_TP_PCB 1168.31,1410.43 r270 bottom (schematic designator TP1015_4)
TP1015_4_CH4 "PCB" GEN_TP_PCB 1168.31,603.35 r270 bottom (schematic designator TP1015_4)
TP1016_4_CH1 "PCB" GEN_TP_PCB 1783.46,3202.36 r270 bottom (schematic designator TP1016_4)
TP1016_4_CH2 "PCB" GEN_TP_PCB 1783.46,2395.28 r270 bottom (schematic designator TP1016_4)
TP1016_4_CH3 "PCB" GEN_TP_PCB 1783.46,1588.19 r270 bottom (schematic designator TP1016_4)
TP1016_4_CH4 "PCB" GEN_TP_PCB 1783.46,781.1 r270 bottom (schematic designator TP1016_4)
TP1017_4_CH1 "PCB" GEN_TP_PCB 1796.26,3286.42 r270 bottom (schematic designator TP1017_4)
TP1017_4_CH2 "PCB" GEN_TP_PCB 1796.26,2479.33 r270 bottom (schematic designator TP1017_4)
TP1017_4_CH3 "PCB" GEN_TP_PCB 1796.26,1672.24 r270 bottom (schematic designator TP1017_4)
TP1017_4_CH4 "PCB" GEN_TP_PCB 1796.26,865.16 r270 bottom (schematic designator TP1017_4)
TP1018_4_CH1 "PCB" GEN_TP_PCB 1490.87,3063.27 r0 bottom (schematic designator TP1018_4)
TP1018_4_CH2 "PCB" GEN_TP_PCB 1490.87,2256.18 r0 bottom (schematic designator TP1018_4)
TP1018_4_CH3 "PCB" GEN_TP_PCB 1490.87,1449.09 r0 bottom (schematic designator TP1018_4)
TP1018_4_CH4 "PCB" GEN_TP_PCB 1490.87,642.01 r0 bottom (schematic designator TP1018_4)
U1 "SN74LVC1G17" GEN_SC-70-5 328.74,3385.83 r0 bottom
U2 "MCP4452-104E" MC_TSSOP14 2277.36,3368.11 r270 top
U3 "MCP4728" MC_MSOP10_UN 2465.35,3338.58 r90 top
U4 "REF2025" GEN_SOT23_5_950_2900X1600X1450 2692.91,3365.55 r180 top
U5 "OPA140AIDBVR" GEN_SOT23_5_950_2900X1600X1450 2869.39,3353.94 r270 top
U6 "HMCAD1520" AD_QFN48_LP7 2683.78,2168.31 r0 top
U7 "ZL30260LDG1" MC_QFN56_ZL30260 3192.91,2208.66 r90 top
U8 "TPS62A02" TI_SOT563_DRL0006A 3539.37,1386.27 r0 top
U9 "NCP161ASN330T1G" GEN_SOT23_5_950_2900X1600X1450 2340.55,2239.17 r0 top
U10 "FIN1019MTCX" GEN_TSSOP-14_4.4X5MM_P0.65MM 3340.55,748.03 r270 bottom
U11 "TPS62913" TPS62913RPUR 1984,539 r270 bottom value=TPS62913RPUR
"U12_4_ADC Driver 1" "ADA4930-1YCPZ" AD_QFN16_CP-16-21 3021.53,2638.78 r270 top (schematic designator U12_4)
"U12_4_ADC Driver 2" "ADA4930-1YCPZ" AD_QFN16_CP-16-21 2803.02,2638.78 r270 top (schematic designator U12_4)
"U12_4_ADC Driver 3" "ADA4930-1YCPZ" AD_QFN16_CP-16-21 2584.51,2638.78 r270 top (schematic designator U12_4)
"U12_4_ADC Driver 4" "ADA4930-1YCPZ" AD_QFN16_CP-16-21 2366.01,2638.78 r270 top (schematic designator U12_4)
U13 "LM27761" TI_WSON8_DSG0008A 3158.66,3381.3 r0 top
U14 "TPS7A9101" TI_WSON10_DSK0010A 2222.44,2019.69 r270 top
U15 "TPS7A9101" TI_WSON10_DSK0010A 3512.01,3239.17 r90 top
U16 "NCP161ASN330T1G" GEN_SOT23_5_950_2900X1600X1450 1911.42,2898.62 r0 top
U17 "TPS61023" TI_SOT563_DRL0006A 3786.81,3218.9 r0 top
U18 "IC FPGA XC7A50T-2CSG325C" XILINX_XC7A50T-2CSG325C 2990.16,1312.5 r90 top
U19 "MX25L6433FZNI-08G" MX_WSON8 2632.28,1743.7 r0 bottom
U20 "TPS62A02" TI_SOT563_DRL0006A 3425.2,1186.02 r180 top
U21 "TPS62A02" TI_SOT563_DRL0006A 2247.05,1452.76 r180 top
U22 "TPS7A9101" TI_WSON10_DSK0010A 2326.77,1155.51 r270 top
U23 "TPS62A02" TI_SOT563_DRL0006A 2360.24,1649.61 r0 top
U1001_4_CH1 "TMUX4053" TI_TSOT-23-16_DYY0016A 1548.23,3127.95 r270 top (schematic designator U1001_4)
U1001_4_CH2 "TMUX4053" TI_TSOT-23-16_DYY0016A 1548.23,2320.87 r270 top (schematic designator U1001_4)
U1001_4_CH3 "TMUX4053" TI_TSOT-23-16_DYY0016A 1548.23,1513.78 r270 top (schematic designator U1001_4)
U1001_4_CH4 "TMUX4053" TI_TSOT-23-16_DYY0016A 1548.23,706.69 r270 top (schematic designator U1001_4)
U1008_4_CH1 "LMH6518" TI_WQFN_RGH0016A 1865.16,3306.1 r270 top (schematic designator U1008_4)
U1008_4_CH2 "LMH6518" TI_WQFN_RGH0016A 1865.16,2499.02 r270 top (schematic designator U1008_4)
U1008_4_CH3 "LMH6518" TI_WQFN_RGH0016A 1865.16,1691.93 r270 top (schematic designator U1008_4)
U1008_4_CH4 "LMH6518" TI_WQFN_RGH0016A 1865.16,884.84 r270 top (schematic designator U1008_4)
U1009_4_CH1 "BUF802" TI_VQFN_RGT0016C 1519.69,3380.91 r0 top (schematic designator U1009_4)
U1009_4_CH2 "BUF802" TI_VQFN_RGT0016C 1519.69,2573.82 r0 top (schematic designator U1009_4)
U1009_4_CH3 "BUF802" TI_VQFN_RGT0016C 1519.69,1766.73 r0 top (schematic designator U1009_4)
U1009_4_CH4 "BUF802" TI_VQFN_RGT0016C 1519.69,959.65 r0 top (schematic designator U1009_4)
U1011_4_CH1 "OPA140AIDBVR" GEN_SOT23_5_950_2900X1600X1450 1564.96,2908.96 r0 top (schematic designator U1011_4)
U1011_4_CH2 "OPA140AIDBVR" GEN_SOT23_5_950_2900X1600X1450 1564.96,2101.87 r0 top (schematic designator U1011_4)
U1011_4_CH3 "OPA140AIDBVR" GEN_SOT23_5_950_2900X1600X1450 1564.96,1294.78 r0 top (schematic designator U1011_4)
U1011_4_CH4 "OPA140AIDBVR" GEN_SOT23_5_950_2900X1600X1450 1564.96,487.7 r0 top (schematic designator U1011_4)
Y1 "10MHz" ECS_TXO-3225 3543.31,2206.69 r180 top
Y2 "25MHz" ECS_TXO-2016 3376.74,1665.35 r180 top

## Footprints (in the part's own frame and the unit in brackets; to place one, negate y for a bottom-side part, rotate by r counter-clockwise, add the part's x,y. Pads: shape width x height; smd on the part's side, far side on the other; paste and mask are expansions set on the pad)
AD_QFN16_CP-16-21 [mm]
  rrect100% 0.8x0.25 smd mask+0: 1(-1.45,0.75) 2(-1.45,0.25) 3(-1.45,-0.25) 4(-1.45,-0.75) 9(1.45,-0.75) 10(1.45,-0.25) 11(1.45,0.25) 12(1.45,0.75)
  rrect100% 0.25x0.8 smd mask+0: 5(-0.75,-1.45) 6(-0.25,-1.45) 7(0.25,-1.45) 8(0.75,-1.45) 13(0.75,1.45) 14(0.25,1.45) 15(-0.25,1.45) 16(-0.75,1.45)
  rrect5% 1.392x1.392 smd paste-0.1 mask+0: 17(0,0)
  silkscreen extent -2.47,-1.7 1.7,1.7, body extent -1.5,-1.5 1.5,1.5, height 0.76
AD_QFN48_LP7 [mm]
  rrect100% 0.9x0.25 smd mask+0: 1(-3.375,2.75) 2(-3.375,2.25) 3(-3.375,1.75) 4(-3.375,1.25) 5(-3.375,0.75) 6(-3.375,0.25) 7(-3.375,-0.25) 8(-3.375,-0.75) 9(-3.375,-1.25) 10(-3.375,-1.75) 11(-3.375,-2.25) 12(-3.375,-2.75) 25(3.375,-2.75) 26(3.375,-2.25) 27(3.375,-1.75) 28(3.375,-1.25) 29(3.375,-0.75) 30(3.375,-0.25) 31(3.375,0.25) 32(3.375,0.75) 33(3.375,1.25) 34(3.375,1.75) 35(3.375,2.25) 36(3.375,2.75)
  rrect100% 0.25x0.9 smd mask+0: 13(-2.75,-3.375) 14(-2.25,-3.375) 15(-1.75,-3.375) 16(-1.25,-3.375) 17(-0.75,-3.375) 18(-0.25,-3.375) 19(0.25,-3.375) 20(0.75,-3.375) 21(1.25,-3.375) 22(1.75,-3.375) 23(2.25,-3.375) 24(2.75,-3.375) 37(2.75,3.375) 38(2.25,3.375) 39(1.75,3.375) 40(1.25,3.375) 41(0.75,3.375) 42(0.25,3.375) 43(-0.25,3.375) 44(-0.75,3.375) 45(-1.25,3.375) 46(-1.75,3.375) 47(-2.25,3.375) 48(-2.75,3.375)
  rect 5.28x5.28 smd paste-5.28 mask+0: 49(0,0)
  silkscreen extent -4.42,-3.65 3.65,3.65, body extent -3.5,-3.5 3.5,3.5, height 1
AMPHENOL_F300-1B7H1-11036-E100 [mm]
  rrect25% 0.3x0.85 smd mask+0: 1(-8.75,2.975) 2(-8.25,2.975) 3(-7.75,2.975) 4(-7.25,2.975) 5(-6.75,2.975) 6(-6.25,2.975) 7(-5.75,2.975) 8(-5.25,2.975) 9(-4.75,2.975) 10(-4.25,2.975) 11(-3.75,2.975) 12(-3.25,2.975) 13(-2.75,2.975) 14(-2.25,2.975) 15(-1.75,2.975) 16(-1.25,2.975) 17(-0.75,2.975) 18(-0.25,2.975) 19(0.25,2.975) 20(0.75,2.975) 21(1.25,2.975) 22(1.75,2.975) 23(2.25,2.975) 24(2.75,2.975) 25(3.25,2.975) 26(3.75,2.975) 27(4.25,2.975) 28(4.75,2.975) 29(5.25,2.975) 30(5.75,2.975) 31(6.25,2.975) 32(6.75,2.975) 33(7.25,2.975) 34(7.75,2.975) 35(8.25,2.975) 36(8.75,2.975)
  rrect25% 0.8x2 smd mask+0: SH1(-10.45,-0.2) SH2(10.45,-0.2)
  silkscreen extent -11.15,-2.5 11.15,4.08, body extent -11.15,-2.5 11.15,3.2, height 2
BOU_3MM_POT [mm]
  rrect25% 1.2x1.2 smd mask+0: 1(-1,-1.55) 3(1,-1.55)
  rrect25% 1.6x1.5 smd mask+0: 2(0,1.7)
  silkscreen extent -1.5,-0.8 1.5,1.9, body extent -1.8,-1.91 1.8,2.05, height 1.13
CE-Logo_3.3x4.5mm_SilkScreen [mil]
  silkscreen extent 0,-128 179,0
CONN-SMD_HC-1.25-2PLT [mm]
  rrect20% 0.8x1.62 smd paste+0 mask+0.05: 1(-0.625,1.38) 2(0.625,1.38)
  rrect20% 2.35x2.5 smd paste+0 mask+0.05: 3(2.9,-1.38) 4(-2.9,-1.38)
  silkscreen extent -3.94,-2.27 3.94,1.96, body extent -3.65,-2.15 3.65,2.15, height 4.7
DOSIN-801-0072 [mm]
  round 2 hole 1.2 mask+0: 1(0,-2.275)
  round 3.2 hole 2.6 mask+0: 2(-5.35,-2.275) 2(0,2.275) 2(5.35,-2.275)
  silkscreen extent -5.59,-4.07 5.59,18.28, body extent -5.5,-3.55 5.5,18.95, height 11.9
ECS_TXO-2016 [mm]
  rrect25% 0.8x0.7 smd mask+0: 1(-0.65,-0.5) 2(0.65,-0.5) 3(0.65,0.5) 4(-0.65,0.5)
  silkscreen extent -1.4,-1.2 1.22,1.02, body extent -1,-0.8 1,0.8, height 0.8
ECS_TXO-3225 [mm]
  rrect25% 1.3x1.1 smd mask+0: 1(-1.15,-0.95) 2(1.15,-0.95) 3(1.15,0.95) 4(-1.15,0.95)
  silkscreen extent -2.05,-1.77 -1.85,-1.58, body extent -1.6,-1.25 1.6,1.25, height 1.2
ESD-Logo_6.6x6mm_SilkScreen [mil]
  silkscreen extent -128,-116 127,115
EW_TRIMCAP [mm]
  rrect25% 1.4x1.3 smd mask+0: 1(0,1.95) 2(0,-1.95)
  silkscreen extent -1.6,-2.3 1.6,2.3, body extent -1.6,-2.25 1.6,2.25, height 1.45
GEN_1.27MM_2X5_PIN_TH_RA [mm]
  rect 1.09x1.09 hole 0.74 mask+0: 1(-2.54,-0.635)
  round 1.09 hole 0.74 mask+0: 2(-2.54,0.635) 3(-1.27,-0.635) 4(-1.27,0.635) 5(0,-0.635) 6(0,0.635) 7(1.27,-0.635) 8(1.27,0.635) 9(2.54,-0.635) 10(2.54,0.635)
  silkscreen extent -7.1,-0.73 6.35,7.23, body extent -6.35,-0.89 6.35,7.19, height 3.39
GEN_1.27MM_6_PIN_TH_RA [mm]
  rrect25% 1.09x1.09 hole 0.74 mask+0: 1(3.175,0)
  round 1.09 hole 0.74 mask+0: 2(1.905,0) 3(0.635,0) 4(-0.635,0) 5(-1.905,0) 6(-3.175,0)
  silkscreen extent -4.45,-1.27 4.44,1.27
GEN_5.08MM_1X2_PIN_TH_RA [mm]
  rrect25% 1.5x1.5 hole 0.9 mask+0: 1(-2.54,0)
  round 1.5 hole 0.9 mask+0: 2(2.54,0)
  silkscreen extent -3.81,-1.27 3.81,1.27, body extent -14.73,-1.27 2.86,1.27, height 8.14
GEN_C_0402 [mm]
  rrect25% 0.64x0.64 smd mask+0: 1(0.46,0) 2(-0.46,0)
  silkscreen extent -0.95,-0.5 0.95,0.5, body extent -0.55,-0.3 0.55,0.3, height 0.6
GEN_C_0603 [mm]
  rrect25% 1.05x0.95 smd mask+0: 1(0.725,0) 2(-0.725,0)
  silkscreen extent -1.5,-0.75 1.5,0.75, body extent -0.85,-0.45 0.85,0.45, height 0.9
GEN_C_0805 [mm]
  rrect25% 1.3x1.5 smd mask+0: 1(0.95,0) 2(-0.95,0)
  silkscreen extent -1.8,-0.95 1.8,0.95, body extent -1.1,-0.72 1.1,0.72, height 1.45
GEN_FID [mm]
  round 1 smd paste-1 mask-1: 1(0,0)
GEN_L_1210 [mm]
  rrect25% 1.23x2.72 smd mask+0: 1(-1.435,0) 2(1.435,0)
  silkscreen extent -2.3,-1.65 2.3,1.65, body extent -1.7,-1.35 1.7,1.35, height 1.2
GEN_R_2ARRAY_0606 [mm]
  rrect25% 0.64x0.7 smd mask+0: 1(-0.47,-0.7) 2(0.47,-0.7) 3(0.47,0.7) 4(-0.47,0.7)
  silkscreen extent -1.07,-1.25 1.07,1.25, body extent -0.83,-0.88 0.83,0.88, height 0.56
GEN_R_0402 [mm]
  rrect25% 0.6x0.6 smd mask+0: 1(0.45,0) 2(-0.45,0)
  silkscreen extent -0.92,-0.48 0.92,0.48, body extent -0.55,-0.3 0.55,0.3, height 0.4
GEN_R_0603 [mm]
  rrect25% 0.9x1 smd mask+0: 1(0.8,0) 2(-0.8,0)
  silkscreen extent -1.5,-0.75 1.5,0.75, body extent -0.9,-0.5 0.9,0.5, height 0.6
GEN_R_1206 [mm]
  rrect25% 1.1x2.7 smd mask+0.102: 1(-1.5,0) 2(1.5,0)
  silkscreen extent -2.3,-1.6 2.3,1.6, body extent -1.6,-1.25 1.6,1.25, height 0.7
GEN_SC-70-5 [mm]
  rrect25% 0.85x0.4 smd mask+0: 1(1.125,-0.65) 2(1.125,0) 3(1.125,0.65) 4(-1.125,0.65) 5(-1.125,-0.65)
  silkscreen extent -0.3,-1.52 1.25,1.1, body extent -1.2,-1.07 1.2,1.07, height 1.1
GEN_SOD_523 [mm]
  rrect25% 0.6x0.7 smd mask+0: 1(0.7,0) 2(-0.7,0)
  silkscreen extent -0.63,-0.45 0.63,0.45, body extent -0.8,-0.4 0.8,0.4, height 0.63
GEN_SOT23_5_950_2900X1600X1450 [mm]
  rrect25% 1x0.6 smd mask+0: 1(-1.35,0.95) 2(-1.35,0) 3(-1.35,-0.95) 4(1.35,-0.95) 5(1.35,0.95)
  silkscreen extent -1.48,-1.5 0.45,1.92, body extent -1.5,-1.5 1.5,1.5, height 1.45
GEN_SOT_323 [mm]
  rrect25% 0.47x0.6 smd mask+0: 1(0,-0.95) 2(0.65,0.95) 3(-0.65,0.95)
  silkscreen extent -1.1,-0.7 1.1,0.7, body extent -1.07,-1.05 1.07,1.05, height 1.1
GEN_TP_PCB [mm]
  round 1 smd paste-1 mask+0: 1(0,0)
GEN_TSSOP-14_4.4X5MM_P0.65MM [mm]
  rrect25% 1.475x0.4 smd mask+0: 1(2.863,-1.95) 2(2.863,-1.3) 3(2.863,-0.65) 4(2.863,0) 5(2.863,0.65) 6(2.863,1.3) 7(2.863,1.95) 8(-2.863,1.95) 9(-2.863,1.3) 10(-2.863,0.65) 11(-2.863,0) 12(-2.863,-0.65) 13(-2.863,-1.3) 14(-2.863,-1.95)
  silkscreen extent -2.2,-2.74 3.14,2.61, body extent -3.2,-2.5 3.2,2.5, height 1
Heart [mil]
KEMET_UD2-4.5NU [mm]
  rrect25% 0.8x1.86 smd mask+0: 1(-3.8,-3.3) 2(-0.6,-3.3) 3(1.6,-3.3) 4(3.8,-3.3) 5(3.8,3.3) 6(1.6,3.3) 7(-0.6,3.3) 8(-3.8,3.3)
  silkscreen extent -5.3,-3.25 5.3,3.25, body extent -5.6,-3.4 5.3,3.4, height 5.92
KEY_5015 [mm]
  rrect5% 2.75x1.2 smd mask+0: 1(0,0)
KEY_5019 [mm]
  rrect5% 3.8x2.03 smd mask+0: 1(0,0)
LED_KINGBRIGHT_APFA3010_3X1.5MM_HORIZONTAL [mm]
  rrect15% 1x0.9 smd mask+0: 1(-1.5,0) 2(1.5,0)
  rrect15% 0.4x0.8 smd mask+0: 3(0.4,-0.45) 4(-0.4,-0.45)
  silkscreen extent -2.2,-0.65 1,1.32, body extent -1.5,-0.38 1.5,1.11, height 1
MC_MSOP10_UN [mm]
  rrect100% 1.4x0.35 smd mask+0: 1(-2.2,1) 2(-2.2,0.5) 3(-2.2,0) 4(-2.2,-0.5) 5(-2.2,-1) 6(2.2,-1) 7(2.2,-0.5) 8(2.2,0) 9(2.2,0.5) 10(2.2,1)
  silkscreen extent -2.32,-1.5 1.1,1.85, body extent -2.45,-1.5 2.45,1.5, height 1.1
MC_QFN56_ZL30260 [mm]
  rrect100% 0.85x0.2 smd mask+0: 1(-3.9,3.25) 2(-3.9,2.75) 3(-3.9,2.25) 4(-3.9,1.75) 5(-3.9,1.25) 6(-3.9,0.75) 7(-3.9,0.25) 8(-3.9,-0.25) 9(-3.9,-0.75) 10(-3.9,-1.25) 11(-3.9,-1.75) 12(-3.9,-2.25) 13(-3.9,-2.75) 14(-3.9,-3.25) 29(3.9,-3.25) 30(3.9,-2.75) 31(3.9,-2.25) 32(3.9,-1.75) 33(3.9,-1.25) 34(3.9,-0.75) 35(3.9,-0.25) 36(3.9,0.25) 37(3.9,0.75) 38(3.9,1.25) 39(3.9,1.75) 40(3.9,2.25) 41(3.9,2.75) 42(3.9,3.25)
  rrect100% 0.2x0.85 smd mask+0: 15(-3.25,-3.9) 16(-2.75,-3.9) 17(-2.25,-3.9) 18(-1.75,-3.9) 19(-1.25,-3.9) 20(-0.75,-3.9) 21(-0.25,-3.9) 22(0.25,-3.9) 23(0.75,-3.9) 24(1.25,-3.9) 25(1.75,-3.9) 26(2.25,-3.9) 27(2.75,-3.9) 28(3.25,-3.9) 43(3.25,3.9) 44(2.75,3.9) 45(2.25,3.9) 46(1.75,3.9) 47(1.25,3.9) 48(0.75,3.9) 49(0.25,3.9) 50(-0.25,3.9) 51(-0.75,3.9) 52(-1.25,3.9) 53(-1.75,3.9) 54(-2.25,3.9) 55(-2.75,3.9) 56(-3.25,3.9)
  rrect2% 6.4x6.4 smd paste-6.4 mask+0: 57(0,0)
  silkscreen extent -4.92,-4.15 4.15,4.15, body extent -4,-4 4,4, height 1
MC_TSSOP14 [mm]
  rrect100% 1.4x0.45 smd mask+0: 1(-2.95,1.95) 2(-2.95,1.3) 3(-2.95,0.65) 4(-2.95,0) 5(-2.95,-0.65) 6(-2.95,-1.3) 7(-2.95,-1.95) 8(2.95,-1.95) 9(2.95,-1.3) 10(2.95,-0.65) 11(2.95,0) 12(2.95,0.65) 13(2.95,1.3) 14(2.95,1.95)
  silkscreen extent -3.07,-2.55 1.85,2.85, body extent -3.2,-2.55 3.2,2.55, height 1.2
MX_WSON8 [mm]
  rrect25% 1.05x0.45 smd mask+0: 1(2.82,-1.905) 2(2.82,-0.635) 3(2.82,0.635) 4(2.82,1.905) 5(-2.82,1.905) 6(-2.82,0.635) 7(-2.82,-0.635) 8(-2.82,-1.905)
  rrect2% 3.4x4 smd paste-1.7 mask+0: 9(0,0)
  silkscreen extent -3.2,-2.9 3.7,2.7, body extent -3.05,-2.55 3.05,2.55, height 0.8
OSHW-Logo_5.7x6mm_SilkScreen [mil]
  silkscreen extent -113,-119 113,119
Paw [mil]
PCIEX4-GF-2D-1000-1K-O64 [mm]
  rect 0.7x3.2 smd far side paste-3.2 mask+0: A1(-9.5,0.5)
  rect 0.7x4.2 smd far side paste-4.2 mask+0: A2(-8.5,0) A3(-7.5,0) A4(-6.5,0) A5(-5.5,0) A6(-4.5,0) A7(-3.5,0) A8(-2.5,0) A9(-1.5,0) A10(-0.5,0) A11(0.5,0) A12(3.5,0) A13(4.5,0) A14(5.5,0) A15(6.5,0) A16(7.5,0) A17(8.5,0) A18(9.5,0) A19(10.5,0) A20(11.5,0) A21(12.5,0) A22(13.5,0) A23(14.5,0) A24(15.5,0) A25(16.5,0) A26(17.5,0) A27(18.5,0) A28(19.5,0) A29(20.5,0) A30(21.5,0) A31(22.5,0) A32(23.5,0)
  rect 0.7x4.2 smd paste-4.2 mask+0: B1(-9.5,0) B2(-8.5,0) B3(-7.5,0) B4(-6.5,0) B5(-5.5,0) B6(-4.5,0) B7(-3.5,0) B8(-2.5,0) B9(-1.5,0) B10(-0.5,0) B11(0.5,0) B12(3.5,0) B13(4.5,0) B14(5.5,0) B15(6.5,0) B16(7.5,0) B18(9.5,0) B19(10.5,0) B20(11.5,0) B21(12.5,0) B22(13.5,0) B23(14.5,0) B24(15.5,0) B25(16.5,0) B26(17.5,0) B27(18.5,0) B28(19.5,0) B29(20.5,0) B30(21.5,0) B32(23.5,0)
  rect 0.7x3.2 smd paste-3.2 mask+0: B17(8.5,0.5) B31(22.5,0.5)
STANDOFF_M2_9774025243R [mm]
  round 5.3 / inner round 3.5 / far side round 3.5 hole 3 mask+0: 1(0,0)
TE_2118728-2 [mm]
  rrect25% 0.8x5.55 smd mask+0: 1(-14.581,6.772) 1(-14.579,-6.772) 1(14.579,6.772) 1(14.581,-6.772)
  rrect25% 0.8x3.8 smd mask+0: 1(-14.579,0.003) 1(14.581,0.003)
  rrect25% 4.98x0.8 smd mask+0: 1(-12.491,9.147) 1(-12.489,-9.147) 1(12.489,9.147) 1(12.491,-9.147)
  rrect25% 3.8x0.8 smd mask+0: 1(-6.001,9.147) 1(-5.999,-9.147) 1(-0.001,9.147) 1(0.001,-9.147) 1(5.999,9.147) 1(6.001,-9.147)
  body extent -14.68,-9.25 14.68,9.25, height 7.01
TE_2286211-3 [mm]
  rrect10% 0.85x1.9 smd mask+0: 1(0,0)
  rrect10% 1.1x1.9 smd mask+0: 1(1.275,0)
  silkscreen extent -2.2,-1.1 2.2,1.1, body extent -1.87,-0.85 2.13,0.85, height 2.41
TE_2334884-1 [mm]
  rrect25% 0.6x0.55 smd mask+0: 1(0,0.975)
  rrect25% 0.58x1.58 smd mask+0: 2(-0.96,0) 2(0.96,0)
  rrect25% 0.5x0.5 smd mask+0: 2(0,-1)
  silkscreen extent -1,-1.4 1,1, body extent -1,-1 1,1, height 0.61
TE_M2_KEYM_2199230 [mil]
  rrect25% 12x61 smd paste+0 mask+0: 1(364.17,-148.62) 2(354.33,148.62) 3(344.49,-148.62) 4(334.65,148.62) 5(324.8,-148.62) 6(314.96,148.62) 7(305.12,-148.62) 8(295.28,148.62) 9(285.43,-148.62) 10(275.59,148.62) 11(265.75,-148.62) 12(255.91,148.62) 13(246.06,-148.62) 14(236.22,148.62) 15(226.38,-148.62) 16(216.54,148.62) 17(206.69,-148.62) 18(196.85,148.62) 19(187.01,-148.62) 20(177.17,148.62) 21(167.32,-148.62) 22(157.48,148.62) 23(147.64,-148.62) 24(137.8,148.62) 25(127.95,-148.62) 26(118.11,148.62) 27(108.27,-148.62) 28(98.43,148.62) 29(88.58,-148.62) 30(78.74,148.62) 31(68.9,-148.62) 32(59.06,148.62) 33(49.21,-148.62) 34(39.37,148.62) 35(29.53,-148.62) 36(19.68,148.62) 37(9.84,-148.62) 38(0,148.62) 39(-9.84,-148.62) 40(-19.69,148.62) 41(-29.53,-148.62) 42(-39.37,148.62) 43(-49.21,-148.62) 44(-59.06,148.62) 45(-68.9,-148.62) 46(-78.74,148.62) 47(-88.58,-148.62) 48(-98.43,148.62) 49(-108.27,-148.62) 50(-118.11,148.62) 51(-127.95,-148.62) 52(-137.8,148.62) 53(-147.64,-148.62) 54(-157.48,148.62) 55(-167.32,-148.62) 56(-177.17,148.62) 57(-187.01,-148.62) 58(-196.85,148.62) 67(-285.43,-148.62) 68(-295.28,148.62) 69(-305.12,-148.62) 70(-314.96,148.62) 71(-324.8,-148.62) 72(-334.65,148.62) 73(-344.49,-148.62) 74(-354.33,148.62) 75(-364.17,-148.62)
  rrect10% 47x108 smd mask+0: 76(407.48,-118.11) 77(-407.48,-118.11)
  round 43 hole 43 mask+0: Un1(393.7,59.06)
  round 63 hole 63 mask+0: Un2(-393.7,59.06)
  silkscreen extent -436,-176 436,177, body extent -431,-170 431,173, height 162
TI_SOT563_DRL0006A [mm]
  rrect25% 0.67x0.3 smd mask+0: 1(-0.74,0.5) 2(-0.74,0) 3(-0.74,-0.5) 4(0.74,-0.5) 5(0.74,0) 6(0.74,0.5)
  silkscreen extent -0.97,-0.85 0.65,1.07, body extent -0.8,-0.85 0.8,0.85, height 0.6
TI_TSOT-23-16_DYY0016A [mm]
  rrect25% 1.05x0.3 smd mask+0: 1(-1.5,1.75) 2(-1.5,1.25) 3(-1.5,0.75) 4(-1.5,0.25) 5(-1.5,-0.25) 6(-1.5,-0.75) 7(-1.5,-1.25) 8(-1.5,-1.75) 9(1.5,-1.75) 10(1.5,-1.25) 11(1.5,-0.75) 12(1.5,-0.25) 13(1.5,0.25) 14(1.5,0.75) 15(1.5,1.25) 16(1.5,1.75)
  silkscreen extent -1.77,-2.21 1,2.51, body extent -1.63,-2.1 1.63,2.1, height 1.02
TI_VQFN_RGT0016C [mm]
  rrect100% 0.8x0.25 smd mask+0: 1(-1.45,0.75) 2(-1.45,0.25) 3(-1.45,-0.25) 4(-1.45,-0.75) 9(1.45,-0.75) 10(1.45,-0.25) 11(1.45,0.25) 12(1.45,0.75)
  rrect100% 0.25x0.8 smd mask+0: 5(-0.75,-1.45) 6(-0.25,-1.45) 7(0.25,-1.45) 8(0.75,-1.45) 13(0.75,1.45) 14(0.25,1.45) 15(-0.25,1.45) 16(-0.75,1.45)
  rrect5% 1.68x1.68 smd paste-0.1 mask+0: 17(0,0)
  silkscreen extent -2.47,-1.7 1.7,1.7, body extent -1.55,-1.55 1.55,1.55, height 1
TI_WQFN_RGH0016A [mm]
  rrect100% 0.85x0.25 smd mask+0: 1(-1.925,0.75) 2(-1.925,0.25) 3(-1.925,-0.25) 4(-1.925,-0.75) 9(1.925,-0.75) 10(1.925,-0.25) 11(1.925,0.25) 12(1.925,0.75)
  rrect100% 0.25x0.85 smd mask+0: 5(-0.75,-1.925) 6(-0.25,-1.925) 7(0.25,-1.925) 8(0.75,-1.925) 13(0.75,1.925) 14(0.25,1.925) 15(-0.25,1.925) 16(-0.75,1.925)
  rrect2% 2.6x2.6 smd paste-1.3 mask+0: 17(0,0)
  silkscreen extent -2.97,-2.2 2.2,2.2, body extent -2.05,-2.05 2.05,2.05, height 0.8
TI_WSON8_DSG0008A [mm]
  rrect25% 0.5x0.25 smd mask+0: 1(-0.95,0.75) 2(-0.95,0.25) 3(-0.95,-0.25) 4(-0.95,-0.75) 5(0.95,-0.75) 6(0.95,-0.25) 7(0.95,0.25) 8(0.95,0.75)
  rrect5% 0.9x1.6 smd paste-0.9 mask+0: 9(0,0)
  silkscreen extent -1.38,-1.2 1.05,1.25, body extent -1.05,-1.05 1.05,1.05, height 0.8
TI_WSON10_DSK0010A [mm]
  rrect25% 0.6x0.25 smd mask+0: 1(-1.15,1) 2(-1.15,0.5) 3(-1.15,0) 4(-1.15,-0.5) 5(-1.15,-1) 6(1.15,-1) 7(1.15,-0.5) 8(1.15,0) 9(1.15,0.5) 10(1.15,1)
  rrect5% 1.2x2 smd paste-2 mask+0: 11(0,0)
  silkscreen extent -1.7,-1.4 1.3,1.45, body extent -1.3,-1.3 1.3,1.3, height 0.8
TI_X1SON_DPY0002A [mm]
  rrect25% 0.3x0.5 smd mask+0: 1(0.35,0) 2(-0.35,0)
  body extent -0.5,-0.3 0.5,0.3, height 0.45
TPS62913RPUR [mm]
  rect 0.65x0.25 smd paste+0 mask+0.05: 1(-0.875,0.15) 3(-0.875,-0.85)
  rect 1x0.25 smd paste+0 mask+0.05: 2(-0.7,-0.35) 4(0.7,-0.85) 6(0.7,0.15)
  rect 0.7x0.25 smd paste+0 mask+0.05: 5(0.875,-0.35)
  rect 0.25x0.6 smd paste+0 mask+0.05: 7(0.75,0.85) 8(0.25,0.85) 9(-0.25,0.85) 10(-0.75,0.85)
  silkscreen extent -1.57,-1.21 1.07,0.97, body extent -1,-1.1 1,0.9, height 1
UKCA-Logo_3.3x3.3mm_SilkScreen [mil]
  silkscreen extent 0,-128 128,0